# Altium PCB RheoBoard_v2.PcbDoc (part 5 of 5)
Units mm, origin at the board's own origin, x right, y up, seen from the top; angles counter-clockwise.
Board outline 136.04 x 88.34 mm, 2 copper layers (Top Layer, Bottom Layer); 133 components, 71 nets, 341 pads, 184 vias.
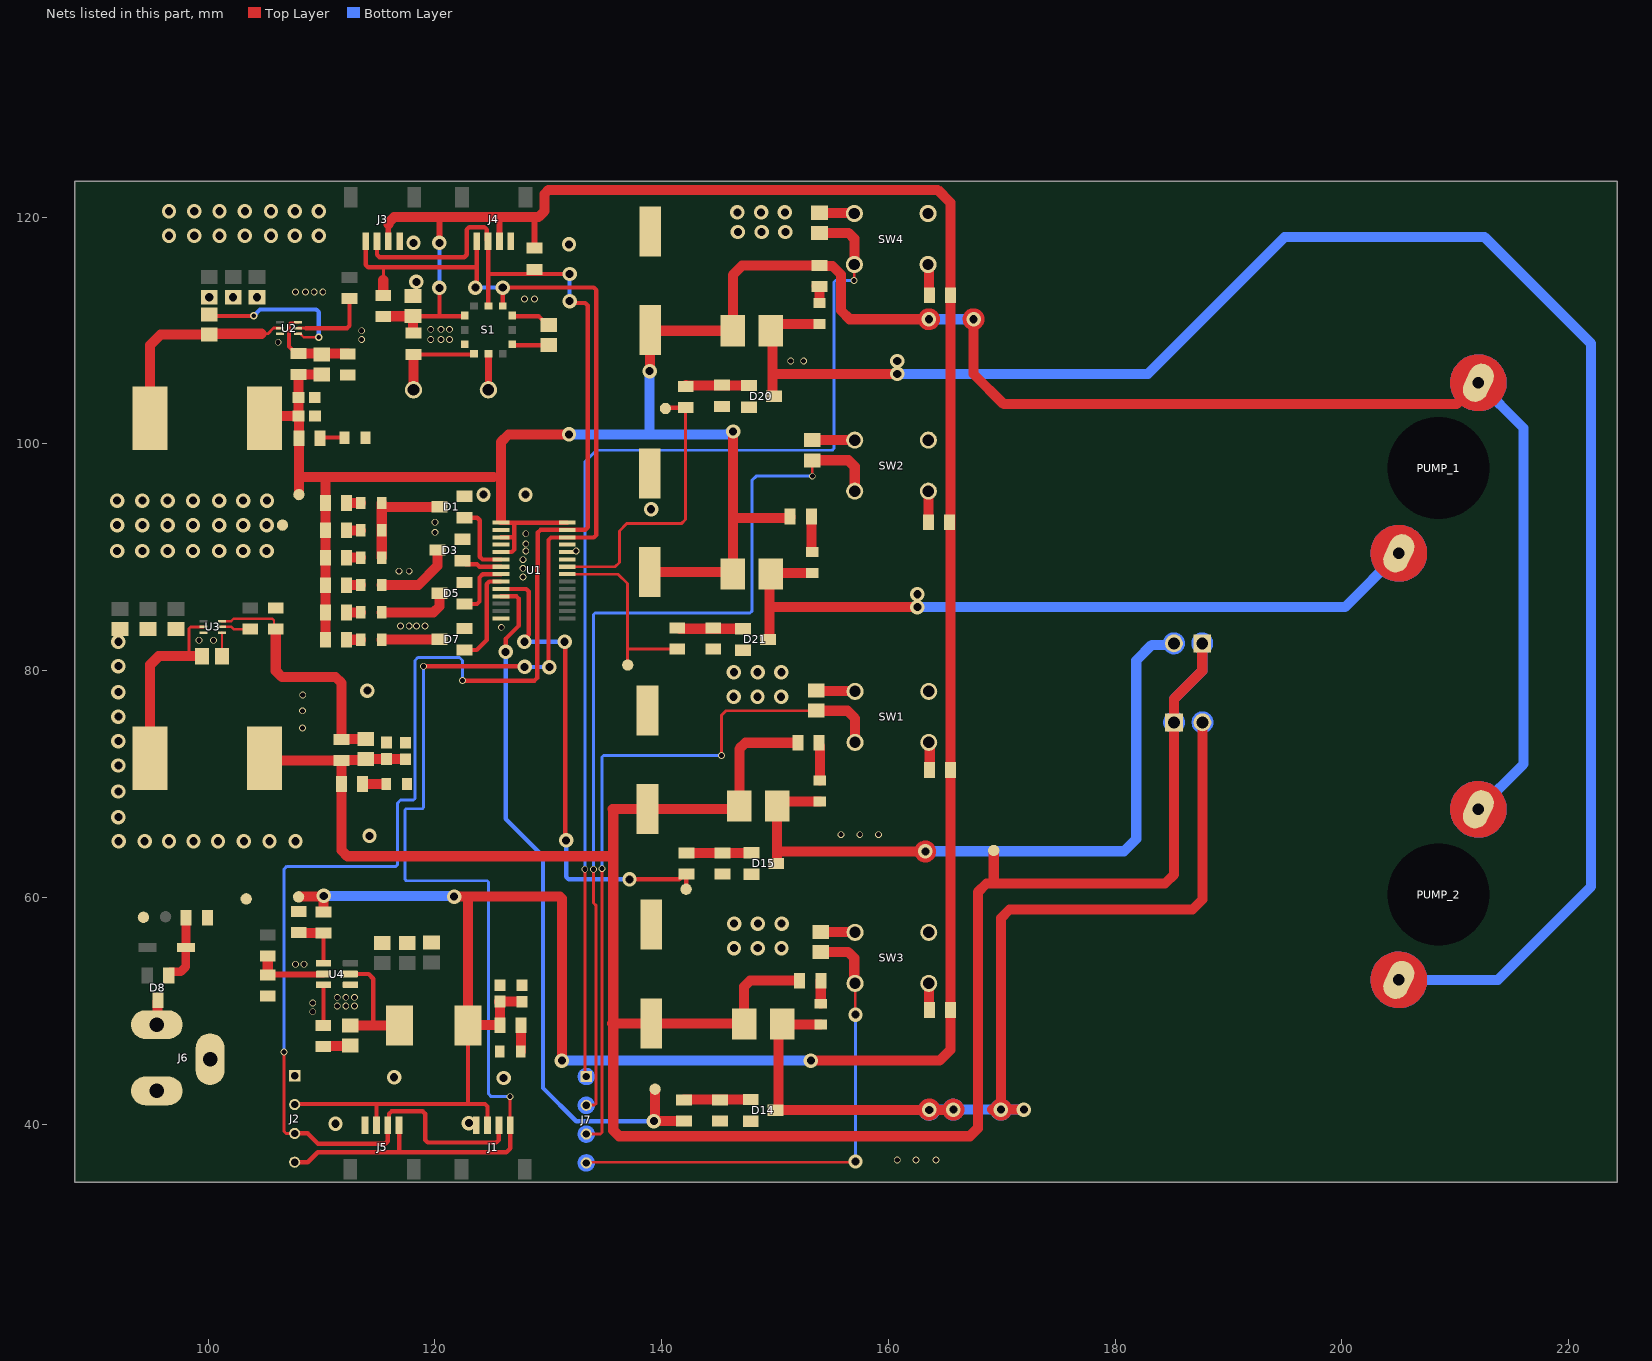
[diagram p2: the nets of this part, all layers, seen from the top]

## Via types
v1: diameter 1.27, hole 0.711, Top Layer to Bottom Layer, tented both sides, 118 vias
v2: diameter 0.6, hole 0.45, Top Layer to Bottom Layer, tented both sides, 64 vias
v3: diameter 0.65, hole 0.4, Top Layer to Bottom Layer, tented both sides, 2 vias

## Nets (pads, with @x,y where several pads share a name; then routed paths per layer and width w, separated by ;. In a path a pad name is that pad's centre, name@x,y a point inside that pad or via, vN(x,y) a via of type N, cw(c..) or ccw(c..) an arc to the next point about the centre after c; other vN are vias at no path point) (continued)
GND: C3.2 C7.1 C8.1 C9.1 C10.1 C11.1 C12.1 C15.1 C16.1 C17.1 C18.1 C22.1 C23.1 C24.1 C25.1 C26.1 C28.2 C29.2 C30.2 C31.2 D1.2 D3.2 D5.2 D7.2 D14.2 D15.2 D20.2 D21.2 GND.1 J1.1 J2.01 J3.1 J4.1 J5.1 J6.2 J6.3 lLED1.1 lLED2.1 lLED3.1 R19.2 R20.1 R27.1 R28.1 R33.1 R34.1 R39.1 R40.1 R41.1 S1.10 SW1.3 SW2.3 SW3.3 SW4.3 U1.2 U1.4 U1.14 U1.23 U1.24 U1.25 U2.3 U3.3 U4.1
  other v1: 111.227,40.03 122.987,40.081 126.06,44.069 116.395,44.133 146.38,55.524 148.476,55.524 150.571,55.524 146.393,57.683 148.488,57.683 150.584,57.683 92.1,64.948 94.386,64.948 96.545,64.948 98.704,64.948 100.863,64.948 103.149,64.948 105.41,64.948 107.696,64.948 114.224,65.43 92.075,67.081 92.075,69.342 92.075,71.628 92.075,73.787 92.075,75.946 146.355,77.699 148.45,77.699 150.546,77.699 92.075,78.105 114.046,78.232 146.368,79.858 148.463,79.858 150.558,79.858 92.075,80.391 92.075,82.55 91.965,90.551 94.196,90.551 96.427,90.551 98.658,90.551 100.965,90.551 103.075,90.551 105.156,90.551 91.965,92.837 94.196,92.837 96.427,92.837 98.658,92.837 100.965,92.837 103.075,92.837 105.156,92.837 139.065,94.234 91.965,94.996 94.196,94.996 96.427,94.996 98.658,94.996 100.965,94.996 103.075,94.996 105.185,94.996 124.282,95.529 127.991,95.529 100.09,112.939 102.2,112.939 104.31,112.939 118.364,114.3 131.826,117.602 118.11,117.729 96.537,118.364 98.768,118.364 100.999,118.364 103.23,118.364 105.537,118.364 107.647,118.364 109.757,118.364 146.723,118.694 148.819,118.694 150.914,118.694 146.672,120.421 148.768,120.421 150.863,120.421 96.537,120.523 98.768,120.523 100.999,120.523 103.23,120.523 105.537,120.523 107.647,120.523 109.757,120.523
  other v2: 160.782,36.83 162.433,36.83 164.211,36.83 109.22,49.911 111.379,50.419 112.141,50.419 112.903,50.419 109.22,50.673 111.379,51.181 112.141,51.181 112.903,51.181 107.696,54.102 108.458,54.102 155.829,65.532 157.48,65.532 159.131,65.532 108.331,74.93 108.331,76.454 108.34,77.852 99.187,82.677 100.457,82.677 125.857,83.82 116.967,83.947 117.729,83.947 118.364,83.947 119.126,83.947 127.762,88.265 116.84,88.773 117.729,88.773 127.762,89.027 127.762,89.789 128.016,90.551 132.461,90.551 128.016,91.186 128.016,92.075 120.015,92.202 120.015,93.091 151.384,107.315 152.527,107.315 106.172,108.966 113.538,109.22 119.634,109.22 120.523,109.22 121.285,109.22 113.538,109.982 119.634,110.109 120.523,110.109 121.285,110.109 127.889,112.776 128.778,112.776 107.696,113.411 108.585,113.411 109.347,113.411 110.109,113.411
Net3V3_1: 3V3.1 C3.1 C25.2 C26.2 J1.2 J2.02 J3.2 J4.2 J5.2 L3.2 R1.2 R2.2 R3.1 R4.1 R6.2 R7.2 R8.2 R25.2 R26.2 S1.12 | length 269.9
  Top Layer w0.381: J2.02@107.63,41.72 107.68,41.77 122.86,41.77 ; J5.2@114.84,39.903 114.84,41.656 ; C3.1@118.06,111.265 118.073,111.252 120.396,111.252 ; v1(120.396,113.767) 120.396,111.252 ; S1.12@122.614,111.252 120.396,111.252 ; L3.2@122.92,48.7 122.92,41.83 122.86,41.77 ; J1.2@124.64,39.903 124.64,41.547 124.417,41.77 122.86,41.77
  Top Layer w0.508: J3.2@115.89,117.88 115.89,119.38 ; v1(120.396,117.729) 120.396,119.888 ; J4.2@125.69,117.88 125.69,119.698 ; R4.1@128.778,117.262 128.778,119.647 129.146,120.015 ; 130.048,122.555 130.054,122.549 130.054,122.415
  Top Layer w0.889: 3V3.1@107.975,60.046 107.997,60.067 110.122,60.067 v1@110.18,60.124 ; R26.2@110.169,58.709 110.18,58.72 v1@110.18,60.124 ; v1(110.19,60.134) v1@110.18,60.124 ; R3.1@115.443,111.252 115.449,111.258 118.054,111.258 C3.1@118.06,111.265 R6.2@118.06,109.982 ; 115.89,119.38 115.89,119.494 116.411,120.015 129.146,120.015 129.667,120.536 129.667,122.047 130.035,122.415 130.054,122.415 164.35,122.415 165.48,121.285 165.48,113.12 165.487,113.113 165.487,71.237 R1.2@165.48,71.23 R7.2@165.48,50.07 165.48,46.557 164.516,45.593 v1(153.162,45.593) ; v1(121.691,60.071) 122.936,60.071 ; C25.2@125.67,50.804 125.67,50.769 125.725,50.714 R25.2@125.725,48.731 122.951,48.731 L3.2@122.92,48.7 122.911,48.709 122.911,60.046 122.936,60.071 ; C25.2@125.72,50.804 125.722,50.802 127.669,50.802 C26.2@127.671,50.799 ; v1(131.191,45.593) 131.191,59.893 131.013,60.071 122.936,60.071
  Bottom Layer w0.381: v1(120.396,113.767) v1(120.396,117.729)
  Bottom Layer w0.889: v1(110.19,60.134) 110.222,60.103 v1@121.66,60.103 ; v1(131.191,45.593) v1(153.162,45.593)
Net4V5_1: 4V5.1 C13.2 C15.2 C16.2 C30.1 C31.1 D18.1 D19.1 L1.1 PUMP_1.1 PUMP_2.1 R9.2 R10.2 R11.2 R12.2 R13.1 R14.1 R15.1 R16.2 R35.1 R36.1 U1.1 U1.3 U1.5 U1.28 | length 296.2
  Top Layer w0.381: U1.3@125.824,91.756 126.981,91.756 127.005,91.78 ; U1.1@125.824,93.051 U1.28@131.666,93.051 ; U1.5@125.837,90.473 126.788,90.473 127.005,90.69 127.005,91.78 ; 127.005,92.921 127.005,91.78
  Top Layer w0.5: 162.858,110.968 ccw(c163.576,110.998) 164.294,110.998 ccw(c163.576,110.998) 162.858,110.968 ; 166.795,110.968 ccw(c167.513,110.998) 168.231,110.998 ccw(c167.513,110.998) 166.795,110.968
  Top Layer w0.889: L1.1@104.98,102.28 105.16,102.46 C16.2@107.964,102.46 ; R16.2@107.96,106.11 107.962,106.108 107.962,102.462 107.978,102.462 108.02,102.419 R12.2@108.02,100.51 108.02,95.549 4V5.1@108.001,95.529 ; R16.2@107.962,106.107 110.008,106.107 C13.2@110.01,106.105 ; 108.153,97.07 110.363,97.07 ; R15.1@110.349,82.72 R14.1@110.349,85.133 R13.1@110.349,87.546 R9.2@110.349,89.959 R10.2@110.349,92.372 R11.2@110.349,94.785 110.349,97.056 110.363,97.07 ; 125.16,97.07 110.363,97.07 ; 125.84,93.3 125.84,100.186 126.492,100.838 v1(131.826,100.838) ; v1(138.938,106.426) 138.969,106.457 138.969,110.014 C30.1@139,110.045 ; C30.1@138.938,109.745 139.175,109.982 D19.1@146.278,109.982 146.278,114.909 147.107,115.738 153.756,115.738 153.797,115.779 153.838,115.738 R35.1@153.924,115.738 153.965,115.698 155.072,115.698 155.829,114.94 155.829,111.76 156.591,110.998 v1(163.576,110.998) ; C31.1@138.94,88.69 146.096,88.69 D18.1@146.278,88.508 ; D18.1@146.304,88.599 v1(146.304,101.092) ; 146.431,93.472 151.302,93.472 151.343,93.513 R36.1@151.343,93.599 ; v1(167.513,110.998) 167.513,106.172 170.18,103.505 210.112,103.505 212.001,105.394 PUMP_1.1@212.042,105.394
  Top Layer w2: 213.542,67.765 ccw(c212.042,67.765) 213.542,67.765 ; 213.542,105.394 ccw(c212.042,105.394) 213.542,105.394
  Bottom Layer w0.889: v1(131.826,100.838) 145.82,100.838 146.001,101.019 146.231,101.019 v1(146.304,101.092) ; 138.938,100.838 v1(138.938,106.426) ; v1(163.576,110.998) v1(167.513,110.998) ; PUMP_2.1@212.042,67.765 216.027,71.751 216.027,101.409 PUMP_1.1@212.042,105.394
  Bottom Layer w2: 213.542,67.765 ccw(c212.042,67.765) 213.542,67.765 ; 213.542,105.394 ccw(c212.042,105.394) 213.542,105.394
Net6V_1: 6V.1 C14.2 C17.2 C18.2 C28.1 C29.1 D12.1 D13.1 J8.1 J9.1 L2.1 R17.2 R18.2 R29.1 R30.1 | length 227.4
  Top Layer w0.889: L2.1@104.98,72.08 R18.2@111.754,72.08 ; C18.2@117.4,72.184 117.39,72.194 115.75,72.194 C17.2@115.74,72.204 115.735,72.209 113.901,72.209 C14.2@113.896,72.215 113.801,72.12 111.795,72.12 R18.2@111.754,72.08 ; 135.509,63.627 112.271,63.627 111.75,64.148 R17.2@111.75,70 111.752,70.002 111.752,72.078 R18.2@111.754,72.08 ; 135.636,48.89 C29.1@139.08,48.89 147.224,48.89 D13.1@147.279,48.835 147.279,52.129 147.799,52.65 152.134,52.65 152.14,52.645 R29.1@152.175,52.645 ; R30.1@152.03,73.64 147.39,73.64 146.854,73.104 D12.1@146.854,68.07 146.574,67.79 C28.1@138.75,67.79 135.664,67.79 135.733,67.721 135.733,39.446 136.254,38.925 167.183,38.925 167.894,39.637 167.894,60.452 168.656,61.214 169.164,61.214 ; 6V.1@169.291,64.135 169.291,61.341 169.164,61.214 ; J8.1@187.686,82.406 187.686,79.99 185.206,77.51 J9.1@185.206,75.438 185.206,62.016 184.404,61.214 169.164,61.214
  Bottom Layer w0.5: J9.1@185.206,76.156 ccw(c185.206,75.438) 185.924,75.438 ccw(c185.206,75.438) J9.1@185.206,76.156 ; J8.1@187.686,81.688 ccw(c187.686,82.406) 188.404,82.406 ccw(c187.686,82.406) J8.1@187.686,81.688
  Bottom Layer w0.889: J9.1@185.206,75.438 185.206,76.156 185.206,77.51 187.686,79.99 187.686,81.688 J8.1@187.686,82.406
NetC1_1: C1.1 SW1.4 | length 3.4
  Top Layer w0.889: C1.1@153.64,78.235 153.673,78.203 157.027,78.203 SW1.4@157.06,78.17
NetC2_1: C2.1 SW2.4 | length 3.7
  Top Layer w0.889: C2.1@153.289,100.326 153.292,100.329 157.028,100.329 SW2.4@157.031,100.332
NetC4_1: C4.1 S1.6 | length 3.2
  Top Layer w0.381: S1.6@126.814,108.712 130.044,108.712 C4.1@130.048,108.716
NetC4_2: C4.2 S1.4 | length 3.6
  Top Layer w0.381: S1.4@126.814,111.252 129.167,111.252 129.933,110.486 C4.2@130.048,110.486
NetC5_1: C5.1 SW3.4 | length 3
  Top Layer w0.889: C5.1@154.035,56.955 154.055,56.935 157.04,56.935 SW3.4@157.06,56.915
NetC6_1: C6.1 SW4.4 | length 3.1
  Top Layer w0.889: C6.1@153.924,120.392 153.957,120.359 156.965,120.359 SW4.4@156.998,120.326
NetC13_1: C13.1 R16.1 R19.1 U2.6 | length 10.6
  Top Layer w0.203: 107.13,110.3 107.13,110.588 107.249,110.707 107.917,110.707 U2.6@107.93,110.72
  Top Layer w0.381: 107.13,110.3 107.13,108.595 107.755,107.97 R16.1@107.96,107.97 ; C13.1@110.01,107.91 112.25,107.91 R19.1@112.31,107.85
  Top Layer w0.889: R16.1@107.96,107.97 107.97,107.96 112.31,107.96 R19.1@112.32,107.95
NetC14_1: C14.1 R18.1 R20.2 U3.6 | length 22.6
  Top Layer w0.203: U3.6@101.2,84.36 102.02,84.36 102.23,84.57 105.67,84.57 105.81,84.43 105.81,83.82 R20.2@105.96,83.67
  Top Layer w0.889: R20.2@105.96,83.67 105.96,79.98 106.499,79.441 111.233,79.441 111.754,78.92 R18.1@111.754,73.94 111.959,73.94 112.004,73.985 C14.1@113.896,73.985
NetC19_1: C19.1 L1.2 U2.2 | length 18.5
  Top Layer w0.254: 104.7,109.72 105.27,109.72 105.77,110.22 U2.2@106.33,110.22
  Top Layer w0.889: L1.2@94.88,102.28 94.88,108.73 95.805,109.655 C19.1@100.1,109.655 100.165,109.72 104.7,109.72
NetC19_2: C19.2 U2.4 | length 14.3
  Top Layer w0.203: U2.4@107.93,109.72 108.171,109.72 108.184,109.707 108.184,109.646 108.43,109.4 v3(109.76,109.4)
  Top Layer w0.381: C19.2@100.1,111.425 100.235,111.29 v3(104.01,111.29)
  Bottom Layer w0.381: v3(104.01,111.29) 104.57,111.85 109.537,111.85 109.76,111.627 v3(109.76,109.4)
NetC20_1: C20.1 L2.2 U3.2 | length 16.9
  Top Layer w0.254: 98.298,81.28 98.298,83.711 98.447,83.86 U3.2@99.6,83.86
  Top Layer w0.889: L2.2@94.88,72.263 94.88,80.529 95.631,81.28 98.298,81.28 C20.1@99.445,81.28
NetC20_2: C20.2 U3.4 | length 2.1
  Top Layer w0.203: U3.4@101.2,83.36 U3.4@101.2,83.36 101.215,83.347 C20.2@101.215,81.28
NetC21_1: C21.1 L3.1 U4.2 | length 10.7
  Top Layer w0.381: U4.2@112.535,53.235 114.155,53.235 114.56,52.83 114.56,48.823 114.697,48.685
  Top Layer w0.889: C21.1@112.54,48.685 114.697,48.685 116.855,48.685 L3.1@116.87,48.7
NetC21_2: C21.2 R21.2 | length 2.4
  Top Layer w0.889: R21.2@110.15,46.83 110.191,46.871 112.496,46.871 C21.2@112.54,46.915
NetD1_1: D1.1 U1.6 | length 6.6
  Top Layer w0.381: D1.1@122.605,93.495 123.727,93.495 123.95,93.272 123.95,90.04 124.19,89.8 U1.6@125.824,89.8
NetD1_3: D1.3 LED1.1 LED2.1 LED3.1 | length 10
  Top Layer w0.889: LED1.1@115.305,89.965 LED2.1@115.305,92.378 LED3.1@115.305,94.705 ; LED3.1@115.305,94.791 LED3.1@115.305,94.705 ; D1.3@120.405,94.445 115.566,94.445 LED3.1@115.305,94.705
NetD3_1: D3.1 U1.7 | length 3.6
  Top Layer w0.381: D3.1@122.435,89.685 122.734,89.386 123.707,89.386 123.932,89.16 125.819,89.16 U1.7@125.824,89.165
NetD3_3: D3.3 LED4.1 | length 7.2
  Top Layer w0.889: LED4.1@115.305,87.552 118.54,87.552 120.235,89.247 D3.3@120.235,90.635 120.14,90.635 D3.3@120.085,90.579
NetD5_1: D5.1 U1.8 | length 5.5
  Top Layer w0.381: D5.1@122.605,85.875 123.712,85.875 123.935,86.098 123.935,88.215 124.225,88.505 U1.8@125.824,88.505
NetD5_3: D5.3 LED5.1 | length 6.7
  Top Layer w0.889: LED5.1@115.305,85.139 119.875,85.139 120.396,85.66 120.396,86.816 D5.3@120.405,86.825 D5.3@120.205,86.825
NetD7_1: D7.1 U1.9 | length 8.6
  Top Layer w0.381: D7.1@122.61,81.82 123.68,81.82 124.57,82.71 124.57,87.634 124.793,87.857 U1.9@125.811,87.857
NetD7_3: D7.3 LED6.1 | length 5.1
  Top Layer w0.889: LED6.1@115.305,82.726 115.305,82.733 115.321,82.748 120.388,82.748 D7.3@120.41,82.77
NetD8_1: D8.1 D9.2 R28.2 | length 6.3
  Top Layer w0.762: D8.1@96.52,53.12 96.52,53.32 96.639,53.439 97.584,53.439 98.03,53.885 D9.2@98.03,55.56 98.045,55.575 98.045,58.195 R28.2@98.06,58.21
NetD8_3: D8.3 J6.1 | length 2.1
  Top Layer w0.762: D8.3@95.563,50.843 D8.3@95.61,50.89
  Top Layer w0.889: J6.1@95.543,48.772 95.543,50.823 D8.3@95.563,50.843
NetD10_1: D10.1 D12.2 D15.3 J8.2 | length 69.9
  Top Layer w0.5: 162.529,64.018 ccw(c163.247,64.048) 163.966,64.048 ccw(c163.247,64.048) 162.529,64.018
  Top Layer w0.889: D15.3@150.11,62.99 150.158,63.038 150.158,64.03 ; D10.1@153.97,68.446 150.582,68.446 D12.2@150.206,68.07 150.158,68.022 150.158,64.03 ; v1(163.265,64.065) 163.23,64.03 150.158,64.03
  Bottom Layer w0.5: J8.2@185.904,82.406 ccw(c185.186,82.406) J8.2@185.904,82.406
  Bottom Layer w0.889: v1(163.265,64.065) 180.778,64.065 181.864,65.151 181.864,80.899 183.24,82.275 185.055,82.275 J8.2@185.186,82.406
NetD10_2: D10.2 R30.2 | length 3.4
  Top Layer w0.889: R30.2@153.89,73.64 153.89,73.435 153.97,73.355 D10.2@153.97,70.294
NetD11_1: D11.1 D13.2 D14.3 J9.2 | length 121.7
  Top Layer w0.5: 162.874,41.245 cw(c163.591,41.29) 164.309,41.29 cw(c163.591,41.29) 164.308,41.245 cw(c163.591,41.29) 162.874,41.245 ; 165.017,41.245 cw(c165.735,41.275) 166.453,41.275 cw(c165.735,41.275) 165.017,41.245 ; 169.926,42.008 cw(c169.941,41.29) 170.659,41.29 cw(c169.941,41.29) 169.926,42.008
  Top Layer w0.889: D11.1@154.03,48.776 154.024,48.77 150.696,48.77 D13.2@150.631,48.835 150.31,48.514 150.31,41.27 D14.3@150.285,41.245 ; v1(165.735,41.275) 165.705,41.245 165.017,41.245 164.308,41.245 162.874,41.245 D14.3@150.285,41.245 ; 169.142,41.29 170.576,41.29 ; v1(169.926,41.275) 169.926,42.008 169.926,58.166 170.688,58.928 186.817,58.928 187.706,59.817 J9.2@187.706,75.438 ; v1@170.539,41.29 171.973,41.29 171.285,41.29 ; D14.3@150.285,41.245 150.255,41.215 D14.3@150.055,41.215 150.085,41.245 D14.3@150.285,41.245
  Bottom Layer w0.5: 164.324,41.26 ccw(c163.606,41.26) 164.324,41.26 ; 166.453,41.275 ccw(c165.735,41.275) 166.453,41.275 ; 170.644,41.275 ccw(c169.926,41.275) 170.644,41.275 ; J9.2@188.424,75.438 ccw(c187.706,75.438) J9.2@188.424,75.438
  Bottom Layer w0.889: v1@163.703,41.275 v1(165.735,41.275) ; v1@165.576,41.275 v1(165.735,41.275) ; v1(171.958,41.275) v1(169.926,41.275) v1(165.735,41.275)
  other v1: 163.606,41.26
NetD11_2: D11.2 R29.2 | length 2
  Top Layer w0.889: D11.2@154.03,50.624 154.033,50.627 154.033,52.643 R29.2@154.035,52.645
NetD14_1: D14.1 R31.2 R33.2 | length 5.9
  Top Layer w0.889: R31.2@141.97,42.145 141.98,42.155 147.845,42.155 D14.1@147.855,42.165
NetD15_1: D15.1 R32.2 R34.2 | length 5.7
  Top Layer w0.889: R32.2@142.195,63.9 142.215,63.92 147.89,63.92 D15.1@147.91,63.94
NetD16_1: D16.1 D18.2 D21.3 PUMP_1.2 | length 86
  Top Layer w0.889: D21.3@149.373,82.748 D21.3@149.446,82.748 ; D21.3@149.456,82.738 D21.3@149.446,82.748 ; D16.1@153.289,88.611 149.733,88.611 D18.2@149.63,88.508 149.502,88.379 149.502,85.591 ; v1(162.56,85.598) 149.508,85.598 149.502,85.591 ; D21.3@149.446,82.748 149.502,82.804 149.502,85.591
  Top Layer w2: 206.526,90.35 ccw(c205.026,90.35) 206.526,90.35
  Bottom Layer w0.889: v1(162.56,85.598) 200.275,85.598 PUMP_1.2@205.026,90.35
  Bottom Layer w2: 206.526,90.35 ccw(c205.026,90.35) 206.526,90.35
  other v1: 162.56,86.741
NetD16_2: D16.2 R36.2 | length 3.2
  Top Layer w0.889: R36.2@153.203,93.599 153.203,90.475 153.218,90.459 D16.2@153.289,90.459
NetD17_1: D17.1 D19.2 D20.3 PUMP_2.2 | length 178.7
  Top Layer w0.889: D20.3@149.898,104.196 149.82,104.196 149.764,104.251 149.764,106.172 ; D17.1@153.924,110.582 150.23,110.582 D19.2@149.63,109.982 149.764,109.848 149.764,106.172 ; v1(160.782,106.172) 149.764,106.172
  Top Layer w2: 206.526,52.721 ccw(c205.026,52.721) 206.526,52.721
  Bottom Layer w0.889: v1(160.782,106.172) 182.88,106.172 194.945,118.237 212.598,118.237 221.996,108.839 221.996,60.96 213.757,52.721 PUMP_2.2@205.026,52.721
  Bottom Layer w2: 206.526,52.721 ccw(c205.026,52.721) 206.526,52.721
  other v1: 160.782,107.315
NetD17_2: D17.2 R35.2 | length 1.7
  Top Layer w0.889: R35.2@153.678,113.919 153.719,113.878 R35.2@153.924,113.878 D17.2@153.924,112.43
NetD20_1: D20.1 R37.2 R39.2 | length 5.6
  Top Layer w0.889: R37.2@142.147,105.18 142.164,105.163 145.322,105.163 147.681,105.163 D20.1@147.698,105.146
NetD21_1: D21.1 R38.2 R40.2 | length 5.8
  Top Layer w0.889: R38.2@141.361,83.761 141.566,83.761 141.629,83.698 D21.1@147.173,83.698
NetLED1_2: LED1.2 R9.1 | length 1.3
  Top Layer w0.889: R9.1@112.209,89.959 112.212,89.962 113.454,89.962 LED1.2@113.457,89.965
NetLED2_2: LED2.2 R10.1 | length 1.3
  Top Layer w0.889: R10.1@112.209,92.372 112.212,92.375 113.454,92.375 LED2.2@113.457,92.378
NetLED3_2: LED3.2 R11.1 | length 1.3
  Top Layer w0.889: R11.1@112.209,94.785 112.212,94.788 113.454,94.788 LED3.2@113.457,94.791
NetLED4_2: LED4.2 R13.2 | length 1.3
  Top Layer w0.889: R13.2@112.209,87.546 112.212,87.549 113.454,87.549 LED4.2@113.457,87.552
NetLED5_2: LED5.2 R14.2 | length 1.3
  Top Layer w0.889: R14.2@112.209,85.133 112.212,85.136 113.454,85.136 LED5.2@113.457,85.139
NetLED6_2: LED6.2 R15.2 | length 1.3
  Top Layer w0.889: R15.2@112.209,82.72 112.212,82.723 113.454,82.723 LED6.2@113.457,82.726
NetlLED1_2: lLED1.2 R12.1 | length 2.2
  Top Layer w0.381: R12.1@109.88,100.51 109.93,100.56 lLED1.2@112.026,100.56
NetlLED2_2: lLED2.2 R17.1 | length 2.1
  Top Layer w0.889: R17.1@113.61,70 lLED2.2@115.696,70
NetlLED3_2: lLED3.2 R25.1 | length 2.3
  Top Layer w0.889: lLED3.2@127.574,46.4 127.58,46.405 127.58,48.726 R25.1@127.585,48.731
NetPUMP1_1: PUMP1.1 R38.1 U1.21 | length 17.2
  Top Layer w0.254: U1.21@131.666,88.505 136.158,88.505 136.982,87.681 136.982,81.915 ; PUMP1.1@137.008,80.493 136.982,80.518 136.982,81.915 ; R38.1@141.361,81.901 141.347,81.915 136.982,81.915
NetPUMP2_1: PUMP2.1 R37.1 U1.22 | length 25.2
  Top Layer w0.254: U1.22@131.666,89.165 131.672,89.16 135.896,89.16 136.271,89.535 136.271,92.329 136.906,92.964 141.732,92.964 142.113,93.345 R37.1@142.113,103.21
  Top Layer w0.381: PUMP2.1@140.589,103.201 R37.1@142.104,103.201
NetR1_1: R1.1 SW1.1 | length 2.6
  Top Layer w0.889: SW1.1@163.31,73.67 163.364,73.67 163.65,73.384 163.65,71.26 R1.1@163.62,71.23
NetR2_1: R2.1 SW2.1 | length 2.8
  Top Layer w0.889: SW2.1@163.531,95.832 163.531,93.29 163.594,93.227 R2.1@163.594,93.022
NetR6_1: R6.1 S1.9 TP1.TP | length 8.5
  Top Layer w0.381: R6.1@118.11,107.909 118.124,107.895 123.43,107.895 S1.9@123.444,107.882
  Top Layer w0.889: TP1.TP@118.11,104.775 R6.1@118.11,107.909
NetR7_1: R7.1 SW3.1 | length 2.4
  Top Layer w0.889: SW3.1@163.56,52.415 163.59,52.385 163.59,50.1 R7.1@163.62,50.07
NetR8_1: R8.1 SW4.1 | length 2.8
  Top Layer w0.889: SW4.1@163.498,115.826 163.594,115.73 163.594,113.147 R8.1@163.634,113.106
NetR21_1: R21.1 U4.6 | length 3.6
  Top Layer w0.381: R21.1@110.15,48.69 110.165,48.705 U4.6@110.165,52.285
NetR22_1: R22.1 U2.5 | length 7.1
  Top Layer w0.203: 108.557,110.21 108.62,110.21
  Top Layer w0.254: U2.5@107.93,110.22 107.935,110.215 108.444,110.215 ; 108.449,110.21 108.62,110.21
  Top Layer w0.381: 108.62,110.21 112.237,110.21 112.46,110.433 R22.1@112.46,112.81
NetR23_1: R23.1 U3.5 | length 2.6
  Top Layer w0.203: U3.5@101.2,83.86 102.06,83.86 102.28,83.64 103.68,83.64 R23.1@103.71,83.67
NetR24_1: R24.1 R41.2 U4.5 | length 6.6
  Top Layer w0.508: R41.2@105.277,53.201 U4.5@110.141,53.201 ; U4.5@110.141,53.211 U4.5@110.165,53.235
  Top Layer w0.762: R24.1@105.25,54.81 R24.1@105.26,54.82
  Top Layer w0.889: R41.2@105.239,53.163 105.25,53.174 R24.1@105.25,54.81
NetR26_1: R26.1 R27.2 U4.4 | length 4.8
  Top Layer w0.381: U4.4@110.165,54.185 110.165,56.845 R26.1@110.169,56.849
  Top Layer w0.889: R27.2@108,56.88 108.016,56.864 110.154,56.864 R26.1@110.169,56.849
NetR31_1: R31.1 U1.11 VALE2.1 | length 63.1
  Top Layer w0.381: U1.11@125.824,86.549 127.192,86.549 127.381,86.36 127.381,83.947 126.238,82.804 v1(126.238,81.661)
  Top Layer w0.889: v1(139.313,40.259) 139.313,40.362 139.421,40.469 VALE2.1@139.421,43.078 ; v1@139.339,40.285 139.352,40.272 141.957,40.272 R31.1@141.97,40.285
  Bottom Layer w0.381: v1(126.238,81.661) 126.238,66.929 129.54,63.627 129.54,43.18 132.461,40.259 v1(139.313,40.259)
NetR32_1: R32.1 U1.10 VALE1.1 | length 43.7
  Top Layer w0.381: U1.10@125.824,87.209 128.047,87.209 128.27,86.986 128.27,83.172 127.889,82.791 v1(127.889,82.55) ; v1(131.445,82.55) 131.508,82.486 131.508,65.087 v1(131.572,65.024) ; v1(137.16,61.595) 141.545,61.595 141.99,62.04 R32.1@142.195,62.04 ; VALE1.1@142.164,60.719 R32.1@142.164,62.071
  Bottom Layer w0.381: v1(127.889,82.55) v1(131.445,82.55) ; v1(131.572,65.024) 131.572,61.818 131.795,61.595 v1(137.16,61.595)
NetS1_8: S1.8 TP2.TP | length 3.1
  Top Layer w0.635: TP2.TP@124.714,104.775 S1.8@124.714,107.882
PUMP1_IN: C2.2 J7.02 SW2.2 | length 85.9
  Top Layer w0.254: J7.02@133.35,41.656 133.372,41.678 134.075,41.678 134.224,41.827 134.224,59.266 133.985,59.505 v2(133.985,62.484) ; v2(153.289,97.155) C2.2@153.289,98.556
  Top Layer w0.889: C2.2@153.289,98.556 156.46,98.556 157.031,97.985 SW2.2@157.031,95.832
  Bottom Layer w0.254: v2@133.985,62.611 133.985,84.941 134.134,85.09 147.806,85.09 147.955,85.239 147.955,96.774 148.336,97.155 v2(153.289,97.155)
  Bottom Layer w0.5: 133.868,41.656 ccw(c133.35,41.656) 133.868,41.656
PUMP2_IN: C6.2 J7.01 SW4.2 | length 103.5
  Top Layer w0.254: v2(133.223,62.484) 133.223,44.323 J7.01@133.35,44.196 ; v2(156.972,114.427) 156.985,114.44 156.985,115.813 SW4.2@156.998,115.826
  Top Layer w0.889: C6.2@153.924,118.622 156.477,118.622 156.998,118.101 SW4.2@156.998,115.826
  Bottom Layer w0.254: v2(133.223,62.484) 133.223,98.403 134.261,99.441 155.045,99.441 155.194,99.59 155.194,114.278 155.343,114.427 v2(156.972,114.427)
  Bottom Layer w0.5: 133.868,44.196 ccw(c133.35,44.196) 133.868,44.196
SCL: J1.4 J2.04 J3.4 J4.4 J5.4 R3.2 S1.3 U1.26 | length 154.3
  Top Layer w0.203: v2(126.619,42.418) v2@126.63,42.407 ; J1.4@126.63,39.914 J1.4@126.64,39.903
  Top Layer w0.254: 115.443,115.57 115.449,115.564 115.449,114.47 ; J1.4@126.63,39.914 v2@126.63,42.407
  Top Layer w0.381: J2.04@107.63,36.64 108.776,36.64 109.656,37.52 116.83,37.52 ; J3.4@113.89,117.88 113.89,115.793 114.113,115.57 115.443,115.57 123.69,115.57 ; J5.4@116.84,39.903 116.84,37.53 116.83,37.52 ; v2(118.999,80.391) 127.864,80.391 v1(127.914,80.34) ; v1(123.571,113.792) 123.69,113.911 123.69,115.57 ; J4.4@123.69,117.88 123.69,115.57 ; S1.3@125.984,112.082 v1(125.984,113.792) 134.016,113.792 134.239,113.569 134.239,91.966 134.016,91.743 U1.26@131.679,91.743 ; J1.4@126.64,39.903 126.64,37.86 126.3,37.52 116.83,37.52 ; v1(130.092,80.308) 130.023,80.378 130.023,91.52 130.246,91.743 U1.26@131.653,91.743
  Top Layer w0.889: R3.2@115.443,113.112 115.443,114.464 115.449,114.47
  Bottom Layer w0.254: v2(118.999,80.391) 118.999,67.937 118.88,67.818 117.467,67.818 117.348,67.699 117.348,61.595 117.475,61.468 124.595,61.468 124.714,61.349 124.714,42.672 124.968,42.418 v2(126.619,42.418)
  Bottom Layer w0.381: v1(123.571,113.792) v1(125.984,113.792) ; v1(127.914,80.34) 127.93,80.324 130.077,80.324 v1(130.092,80.308)
SDA: J1.3 J2.03 J3.3 J4.3 J5.3 R4.2 S1.2 U1.27 | length 160.5
  Top Layer w0.203: R4.2@128.778,115.402 128.905,115.275 128.905,114.981 R4.2@128.905,114.935
  Top Layer w0.254: v2(106.68,46.355) 106.68,39.37 106.87,39.18 J2.03@107.63,39.18
  Top Layer w0.381: J2.03@107.63,39.18 108.775,39.18 109.685,38.27 115.617,38.27 115.84,38.493 J5.3@115.84,39.903 115.949,40.013 115.949,40.9 116.173,41.123 118.927,41.123 119.15,40.9 119.15,38.593 119.373,38.37 125.417,38.37 125.64,38.593 J1.3@125.64,39.903 ; J3.3@114.89,117.88 114.89,116.682 115.113,116.459 122.586,116.459 122.809,116.682 122.809,118.903 123.032,119.126 124.357,119.126 124.581,118.903 124.581,117.989 J4.3@124.69,117.88 124.702,117.868 124.702,114.981 ; v2(122.428,79.121) 128.79,79.121 129.013,79.344 129.013,89.082 129.07,89.139 129.07,92.181 129.306,92.416 U1.27@131.666,92.416 133.254,92.416 133.477,92.64 133.477,112.205 133.254,112.428 132.047,112.428 v1(131.877,112.598) ; S1.2@124.714,112.082 124.702,112.094 124.702,114.981 ; v1(131.877,114.986) 131.872,114.981 128.905,114.981 124.702,114.981
  Bottom Layer w0.254: v2(106.68,46.355) 106.68,62.484 106.934,62.738 116.564,62.738 116.713,62.887 116.713,68.326 116.967,68.58 118.11,68.58 118.237,68.707 118.237,80.899 118.491,81.153 122.174,81.153 122.428,80.899 v2(122.428,79.121)
  Bottom Layer w0.381: v1(131.877,112.598) v1(131.877,114.986)
VALE1_IN: C1.2 J7.03 SW1.2 | length 66.3
  Top Layer w0.254: J7.03@133.35,39.116 134.586,39.116 134.734,39.265 v2(134.734,62.529) ; v2(145.288,72.517) 145.288,76.073 145.68,76.465 C1.2@153.64,76.465
  Top Layer w0.889: C1.2@153.64,76.465 156.389,76.465 157.06,75.794 SW1.2@157.06,73.67
  Bottom Layer w0.254: v2(134.734,62.529) 134.747,62.542 134.747,72.368 134.896,72.517 v2(145.288,72.517)
  Bottom Layer w0.5: 133.868,39.116 ccw(c133.35,39.116) 133.868,39.116
VALE2_IN: C5.2 J7.04 SW3.2 | length 48.3
  Top Layer w0.203: C5.2@153.975,55.245 C5.2@154.035,55.185
  Top Layer w0.254: J7.04@133.35,36.576 133.413,36.639 157.035,36.639 v1(157.099,36.703) ; SW3.2@157.06,52.415 157.079,52.395 157.079,49.677 v1(157.099,49.657)
  Top Layer w0.889: C5.2@154.035,55.185 156.455,55.185 156.99,54.65 156.99,52.485 SW3.2@157.06,52.415
  Bottom Layer w0.254: v1(157.099,36.703) v1(157.099,49.657)
  Bottom Layer w0.5: 133.868,36.576 ccw(c133.35,36.576) 133.868,36.576
pads on no net: J1.S1 J1.S2 J3.S1 J3.S2 J4.S1 J4.S2 J5.S1 J5.S2 PUMP_1.S PUMP_2.3 S1.1 S1.5 S1.7 S1.11 U1.12 U1.13 U1.15 U1.16 U1.17 U1.18 U1.19 U1.20
copper on no net: | length 9
  Top Layer w0.5: 172.691,41.29 ccw(c171.973,41.29) 172.691,41.29
  Bottom Layer w0.5: 172.691,41.29 ccw(c171.973,41.29) 172.691,41.29

## Polygon pours and split planes (outlines as drawn)
GND on Top Layer "GND_L01_P060" (solid, pour order 60): 137.885,59.859 136.615,58.589 136.615,36.74 137.795,35.56 165.735,35.56 167.095,36.92 167.095,58.589 165.825,59.859
GND on Top Layer "GND_L01_P054" (solid, pour order 54): 117.602,115.062 116.713,114.173 116.713,99.822 117.983,98.552 131.572,98.552 132.842,99.822 132.842,114.173 131.953,115.062
GND on Top Layer "GND_L01_P052" (solid, pour order 52): 90.17,122.555 88.9,121.285 88.9,36.195 89.535,35.56 108.585,35.56 109.22,36.195 109.22,42.418 110.236,43.434 128.016,43.434 132.461,47.879 132.461,77.724 130.937,79.248 109.601,79.248 108.077,80.772 108.077,97.409 109.093,98.425 113.157,98.425 114.554,99.822 114.554,114.681 113.03,116.205 111.76,116.205 111.125,116.84 111.125,121.92 110.49,122.555
GND on Top Layer "GND_L01_P036" (solid, pour order 36): 117.602,113.474 117.729,113.347 118.872,113.347 118.999,113.474 118.999,116.903 118.872,117.03 117.729,117.03 117.602,116.903
GND on Top Layer "GND_L01_P058" (solid, pour order 58): 137.566,101.308 136.296,100.038 136.296,82.893 138.074,81.115 164.998,81.115 166.776,82.893 166.776,100.038 165.506,101.308
GND on Top Layer "GND_L01_P053" (solid, pour order 53): 110.744,97.282 109.347,95.885 109.347,81.915 110.617,80.645 132.08,80.645 133.35,81.915 133.35,95.885 131.953,97.282
GND on Top Layer "GND_L01_P050" (solid, pour order 50): 127,41.618 127.279,41.338 131.445,41.338 131.445,45.212 127.47,45.212 127,44.742
GND on Top Layer "GND_L01_P016" (solid, pour order 16): 110.49,35.052 109.982,35.56 109.982,42.164 110.49,42.672 131.445,42.672 131.445,35.814 130.683,35.052
GND on Top Layer "GND_L01_P059" (solid, pour order 59): 137.732,80.623 136.462,79.353 136.462,62.208 138.24,60.43 165.164,60.43 166.942,62.208 166.942,79.353 165.672,80.623
GND on Top Layer "GND_L01_P077" (solid, pour order 77): 159.385,58.737 159.512,58.61 160.655,58.61 160.782,58.737 160.782,62.166 160.655,62.293 159.512,62.293 159.385,62.166
GND on Top Layer "GND_L01_P076" (solid, pour order 76): 159.766,100.266 159.893,100.139 161.036,100.139 161.163,100.266 161.163,103.695 161.036,103.822 159.893,103.822 159.766,103.695
GND on Top Layer "GND_L01_P075" (solid, pour order 75): 160.147,79.566 160.274,79.438 161.417,79.438 161.544,79.566 161.544,82.995 161.417,83.121 160.274,83.121 160.147,82.995
GND on Top Layer "GND_L01_P056" (solid, pour order 56): 137.587,121.899 136.317,120.629 136.317,103.484 138.095,101.706 165.019,101.706 166.797,103.484 166.797,120.629 165.527,121.899
GND on Top Layer "GND_L01_P074" (solid, pour order 74): 149.479,98.742 149.606,98.615 150.749,98.615 150.876,98.742 150.876,102.171 150.749,102.298 149.606,102.298 149.479,102.171
GND on Top Layer "GND_L01_P028" (solid, pour order 28): 107.442,90.106 107.315,89.98 107.315,88.837 107.442,88.709 110.871,88.709 110.998,88.837 110.998,89.98 110.871,90.106
GND on Top Layer "GND_L01_P062" (solid, pour order 62): 110.49,122.555 140.335,122.555 140.97,121.92 140.97,116.84 140.335,116.205 110.49,116.205
GND on Top Layer "GND_L01_P046" (solid, pour order 46): 115.697,40.576 115.824,40.45 116.967,40.45 117.094,40.576 117.094,44.005 116.967,44.133 115.824,44.133 115.697,44.005
GND on Top Layer "GND_L01_P034" (solid, pour order 34): 129.032,95.694 129.159,95.567 130.302,95.567 130.429,95.694 130.429,99.123 130.302,99.251 129.159,99.251 129.032,99.123
GND on Top Layer "GND_L01_P032" (solid, pour order 32): 114.427,77.915 114.554,77.787 115.697,77.787 115.824,77.915 115.824,81.343 115.697,81.471 114.554,81.471 114.427,81.343
GND on Top Layer "GND_L01_P030" (solid, pour order 30): 113.983,103.378 113.855,103.251 113.855,102.108 113.983,101.981 117.411,101.981 117.538,102.108 117.538,103.251 117.411,103.378
GND on Bottom Layer "GND_L02_P070" (solid, pour order 70): 137.566,101.308 136.296,100.038 136.296,82.893 138.074,81.115 164.998,81.115 166.776,82.893 166.776,100.038 165.506,101.308
GND on Bottom Layer "GND_L02_P071" (solid, pour order 71): 137.732,80.623 136.462,79.353 136.462,62.208 138.24,60.43 165.164,60.43 166.942,62.208 166.942,79.353 165.672,80.623
GND on Bottom Layer "GND_L02_P069" (solid, pour order 69): 137.587,121.899 136.317,120.629 136.317,103.484 138.095,101.706 165.019,101.706 166.797,103.484 166.797,120.629 165.527,121.899
GND on Bottom Layer "GND_L02_P072" (solid, pour order 72): 137.885,59.859 136.615,58.589 136.615,36.74 137.795,35.56 165.735,35.56 167.095,36.92 167.095,58.589 165.825,59.859
GND on Bottom Layer "GND_L02_P066" (solid, pour order 66): 110.744,97.282 109.347,95.885 109.347,81.915 110.617,80.645 132.08,80.645 133.35,81.915 133.35,95.885 131.953,97.282
GND on Bottom Layer "GND_L02_P065" (solid, pour order 65): 117.602,115.062 116.713,114.173 116.713,99.822 117.983,98.552 131.572,98.552 132.842,99.822 132.842,114.173 131.953,115.062
GND on Bottom Layer "GND_L02_P063" (solid, pour order 63): 90.17,122.555 88.9,121.285 88.9,36.195 89.535,35.56 108.585,35.56 109.22,36.195 109.22,42.418 110.236,43.434 128.016,43.434 128.905,44.323 128.905,60.96 128.27,61.595 119.38,61.595 118.11,62.865 118.11,78.105 117.475,78.74 110.109,78.74 108.077,80.772 108.077,97.409 109.093,98.425 113.157,98.425 114.554,99.822 114.554,114.681 113.03,116.205 111.76,116.205 111.125,116.84 111.125,121.92 110.49,122.555
GND on Bottom Layer "GND_L02_P068" (solid, pour order 68): 110.49,35.052 109.982,35.56 109.982,42.164 110.49,42.672 129.032,42.672 129.794,41.91 129.794,36.068 128.778,35.052
GND on Bottom Layer "GND_L02_P064" (solid, pour order 64): 110.49,122.555 140.335,122.555 140.97,121.92 140.97,116.84 140.335,116.205 110.49,116.205
GND on Bottom Layer "GND_L02_P051" (solid, pour order 51): 127.406,41.237 127.533,41.11 128.676,41.11 128.803,41.237 128.803,44.666 128.676,44.793 127.533,44.793 127.406,44.666
GND on Bottom Layer "GND_L02_P047" (solid, pour order 47): 115.697,40.703 115.824,40.576 116.967,40.576 117.094,40.703 117.094,44.133 116.967,44.259 115.824,44.259 115.697,44.133
GND on Bottom Layer "GND_L02_P037" (solid, pour order 37): 117.602,113.474 117.729,113.347 118.872,113.347 118.999,113.474 118.999,116.903 118.872,117.03 117.729,117.03 117.602,116.903
GND on Bottom Layer "GND_L02_P035" (solid, pour order 35): 129.032,95.694 129.159,95.567 130.302,95.567 130.429,95.694 130.429,99.123 130.302,99.251 129.159,99.251 129.032,99.123
GND on Bottom Layer "GND_L02_P033" (solid, pour order 33): 114.427,77.915 114.554,77.787 115.697,77.787 115.824,77.915 115.824,81.343 115.697,81.471 114.554,81.471 114.427,81.343
GND on Bottom Layer "GND_L02_P031" (solid, pour order 31): 113.983,103.378 113.855,103.251 113.855,102.108 113.983,101.981 117.411,101.981 117.538,102.108 117.538,103.251 117.411,103.378
GND on Bottom Layer "GND_L02_P029" (solid, pour order 29): 107.442,90.106 107.315,89.98 107.315,88.837 107.442,88.709 110.871,88.709 110.998,88.837 110.998,89.98 110.871,90.106

## Keep-outs
Keep-Out Layer:
  circle w0.254: c220.472,38.862 r1.796
  circle w0.254: c176.276,46.355 r1.796
  circle w0.254: c196.469,46.355 r1.796
  circle w0.254: c176.276,111.76 r1.796
  circle w0.254: c196.469,111.76 r1.796
  circle w0.254: c103.886,38.285 r1.796
  circle w0.254: c221.234,119.38 r1.796
  circle w0.254: c92.685,119.837 r1.796
  lines w0.254: 88.24,34.85 88.24,34.85 ; 88.24,34.85 88.24,123.19 224.282,123.19 ; 88.24,34.85 224.282,34.85 ; 224.282,34.85 224.282,123.19 ; 224.282,34.85 224.282,34.85 ; 224.282,123.19 224.282,123.19

## Other copper
Top Layer:
  region net NetD16_1: 161.036,87.122 161.29,87.376 163.703,87.376 164.084,86.995 164.084,84.455 163.83,84.201 161.29,84.201 161.036,84.455
  region net NetD17_1: 159.258,107.696 159.512,107.95 161.925,107.95 162.306,107.569 162.306,105.029 162.052,104.775 159.512,104.775 159.258,105.029
  text "RheoBoard_V2" at 191.643,78.481 h5
Bottom Layer:
  region: 173.99,50.673 173.99,42.545 168.91,42.545 168.91,50.673
  region: 198.755,42.037 198.755,50.038 203.835,50.038 203.835,42.037
  region net NetD17_1: 198.755,107.442 198.755,115.697 203.835,115.697 203.835,107.442
  region: 173.99,116.078 173.99,107.823 168.91,107.823 168.91,116.078
  region net NetD17_1: 159.258,107.696 159.512,107.95 161.925,107.95 162.306,107.569 162.306,105.029 162.052,104.775 159.512,104.775 159.258,105.029
  region net NetD16_1: 161.036,87.122 161.29,87.376 163.703,87.376 164.084,86.995 164.084,84.455 163.83,84.201 161.29,84.201 161.036,84.455
Multi-Layer:
  lines w0.152: 88.24,34.85 224.282,34.85 224.282,123.19 154.295,123.19 106.965,123.19 88.24,123.19 88.24,34.85

## Silkscreen, mask and mechanical layers (free items; w line width, h text height)
Top Overlay:
  circle w0.254: c176.276,46.355 r1.6
  circle w0.254: c196.469,46.355 r1.6
  circle w0.254: c196.469,111.76 r1.6
  circle w0.254: c220.472,38.862 r1.6
  circle w0.254: c221.234,119.38 r1.6
  circle w0.254: c176.276,46.355 r1.6
  circle w0.254: c196.469,46.355 r1.6
  circle w0.254: c176.276,111.76 r1.6
  circle w0.254: c196.469,111.76 r1.6
  circle w0.254: c92.71,119.83 r1.6
  circle w0.254: c103.886,38.285 r1.6
  region: 193.929,123.19 193.929,106.045 178.308,106.045 178.308,123.19
  region: 178.943,34.925 178.943,52.07 194.564,52.07 194.564,34.925
  lines w0.254: 179.832,34.925 192.832,34.925 ; 184.785,23.622 184.404,24.003 ; 184.785,24.384 184.404,24.003 ; 184.785,134.493 184.404,134.112 ; 186.436,26.943 186.436,24.003 184.404,24.003 ; 186.436,131.172 186.436,134.112 184.404,134.112 ; 219.202,103.124 219.329,103.124 ; 184.404,134.112 184.785,133.731 184.404,134.112 ; 179.936,26.943 192.936,26.943 192.936,51.943 179.936,51.943 179.936,26.943 ; 179.936,106.172 179.936,131.172 192.936,131.172 192.936,106.172 179.936,106.172 ; 180.04,123.19 193.04,123.19 180.04,123.19
  text "2026" at 197.485,96.301 h3
  text "-" at 184.785,86.439 h4
  text "+" at 186.817,86.12 h4
  text "VAL-6V" at 173.482,77.759 h3
  text "-" at 187.198,69.421 h4
  text "+" at 184.277,69.102 h4
  text "2026" at 197.104,58.709 h3
  text "GND" at 109.347,44.078 h0.8
  text "PUMP_IN2" at 128.651,43.819 h0.74
  text "3V3" at 109.347,41.538 h0.8
  text "PUMP_IN1" at 128.651,41.321 h0.74
  text "SDA" at 109.347,38.871 h0.8
  text "VALE_IN1" at 128.652,38.823 h0.74
  text "VALE_IN2" at 128.652,36.326 h0.74
  text "SCL" at 109.474,35.823 h0.8
Bottom Solder:
  region: 203.454,113.411 199.136,113.411 199.136,109.982 203.454,109.982
  region: 173.609,113.538 169.291,113.538 169.291,110.109 173.609,110.109
  region: 173.736,48.133 169.418,48.133 169.418,44.704 173.736,44.704
  region: 199.136,44.577 203.454,44.577 203.454,48.006 199.136,48.006
Mechanical 13:
  lines w0.127: 179.936,34.817 192.936,34.817 ; 179.936,106.172 179.936,131.172 192.936,131.172 192.936,106.172 ; 179.936,106.172 192.936,106.172 ; 179.936,106.172 192.936,106.172 ; 179.936,26.943 192.936,26.943 192.936,51.943 179.936,51.943 179.936,26.943

## Text inside footprints (layer, text, board x,y; h text height)
C28: Top Overlay "+" at 136.15,65.94 h1.27 r270
C29: Top Overlay "+" at 136.48,47.04 h1.27 r270
C30: Top Overlay "+" at 136.4,108.195 h1.27 r270
C31: Top Overlay "+" at 136.34,86.84 h1.27 r270